# EAGLE board huge_numbers (EAGLE 9.6.2)
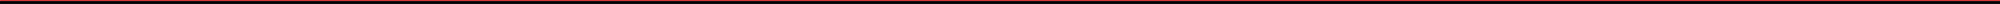
[diagram p0: board, top side]

No outline drawn. Coordinates in mm, seen from the top.
Copper layers used: Top

## Footprints (pad centres in the part's own frame; a part is rotated, then mirrored left to right if it is on the bottom)
P = smd 1 x 1: 1 -1,0; 2 1,0

## Placement (x,y rotation side)
R1  far  [P]  2000,0 0 top
R2  near  [P]  10,10 0 top

## Library data of the parts
R1 R2 = x

## Nets
N: R2.1

## Tracks (layer width: path | path; a pad name or v marks a point on that pad's centre or on a via)
N  (via drill 0.3 pad 0.6)
  Top 0.25: 0,0 100000000000000000000,0
  other vias: 1100,0